# Altium PCB PROC106B_ASCII.PcbDoc (part 8 of 8)
Units mil, origin at the board's own origin, x right, y up, seen from the top; angles counter-clockwise.
Board outline 4498.18 x 1060.53 mil, 8 copper layers (Top Layer, GND1, Sig1, PWR1, PWR2, Sig2, GND2, Bottom Layer), stack 69.602 mil thick; 439 components, 327 nets, 1548 pads, 843 vias.
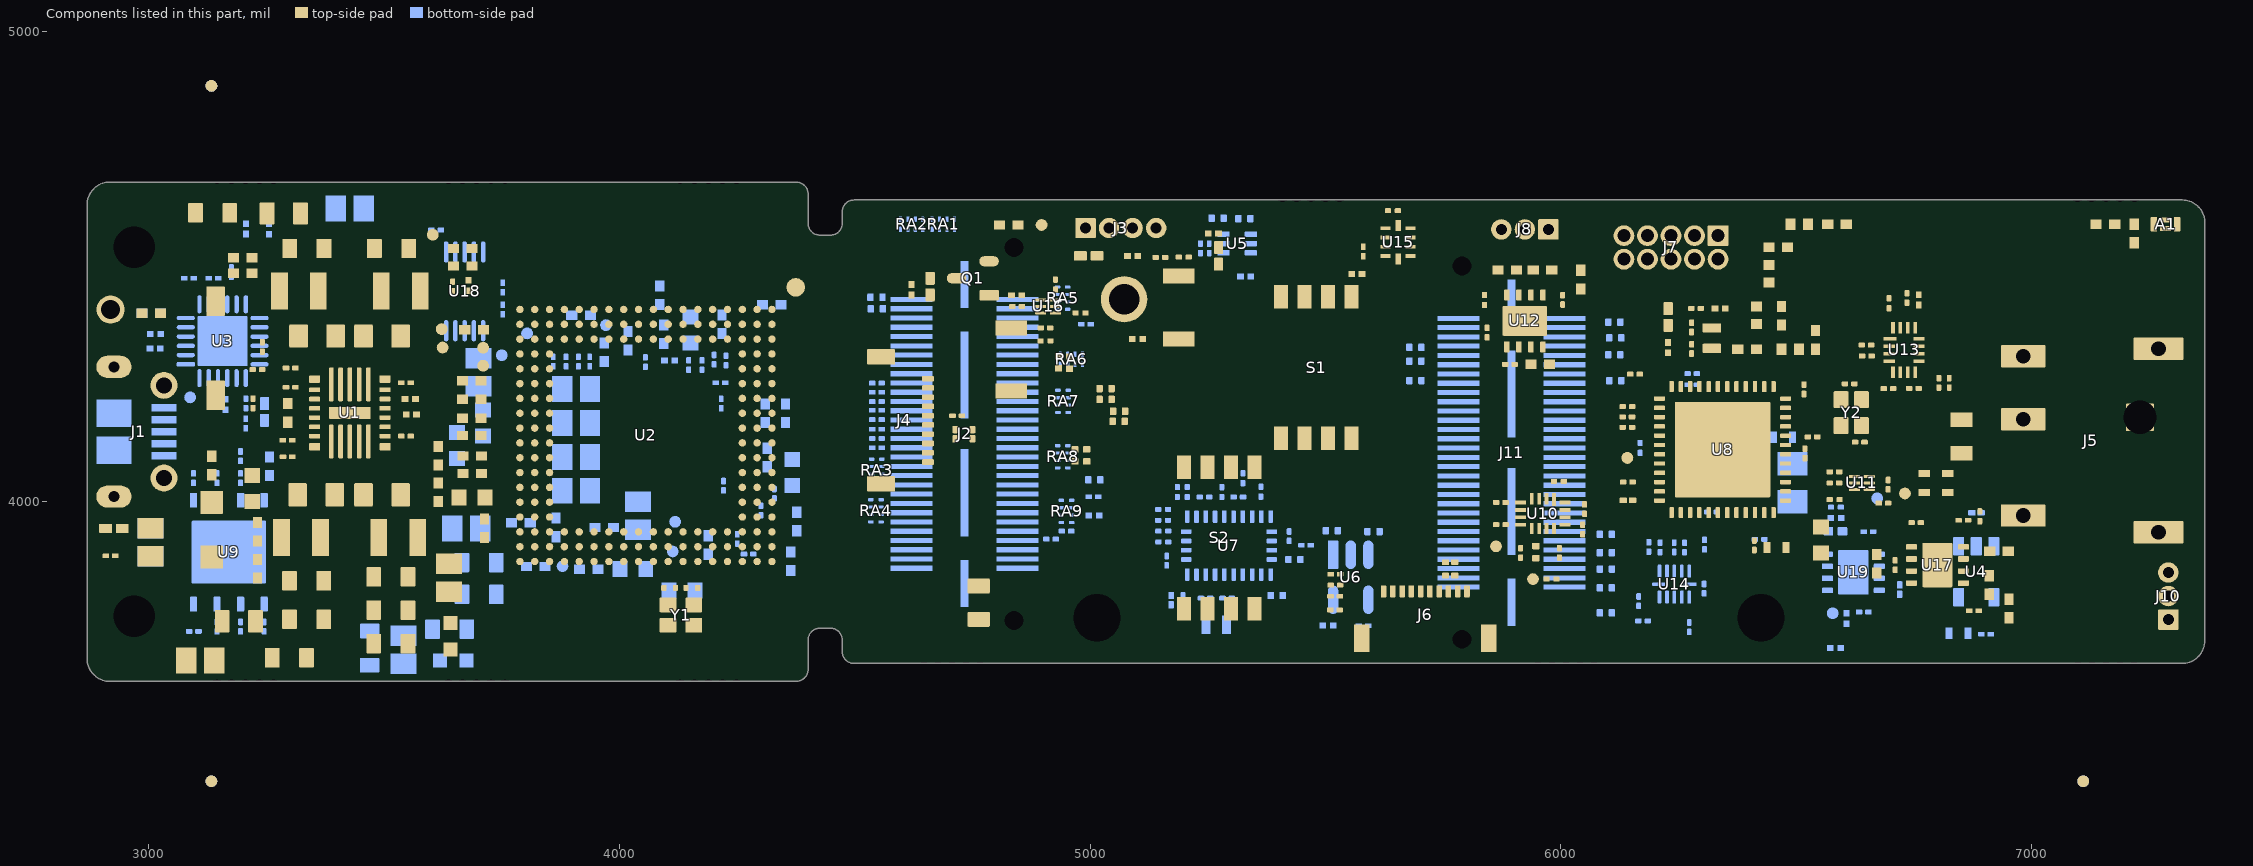
[diagram p14: the components of this part, seen from the top]

## Silkscreen, mask and mechanical layers (free items; w line width, h text height) (continued)
Mechanical 24:
  drawing of 10999 lines, arcs and shapes, not listed
  text "TP33" at 6097.58,6677.7 h30
  text "5V_LED" at 6651.08,6662.7 h30
  text "GND" at 6113.08,6617.7 h30
  text "32" at 8052.58,6517.7 h20
  text "17" at 8422.58,6517.7 h20
  text "U3" at 7956.58,6497.7 h30
  text "D1" at 6081.58,6467.7 h30
  text "33" at 7982.58,6452.7 h20
  text "16" at 8467.58,6452.7 h20
  text "SPARE" at 5513.58,6424.7 h30 r90
  text "DATA_TRAN_PRG" at 5228.58,6398.7 h30 r90
  text "SD_FULL" at 5443.58,6385.7 h30 r90
  text "HDR_ERR" at 5868.58,6380.7 h30 r90
  text "DDR_FULL" at 5588.58,6368.7 h30 r90
  text "LVDS_PATH_ERR" at 5798.58,6363.7 h30 r90
  text "FPGA_ERR" at 5658.58,6358.7 h30 r90
  text "D4" at 7528.58,6350.7 h30 r90
  text "D3" at 7023.58,6346.7 h30 r90
  text "EEPROM_RD_FAIL" at 5998.58,6341.7 h30 r90
  text "D2" at 6548.58,6341.7 h30 r90
  text "SD_DETECT" at 5368.58,6336.7 h30 r90
  text "SW1" at 5689.58,6332.7 h30
  text "6" at 5726.08,6292.7 h20
  text "12BIT_OFF" at 5764.08,6257.7 h30
  text "12BIT_ON" at 5209.58,6232.7 h30
  text "9" at 7141.08,6217.7 h20
  text "9" at 6171.08,6212.7 h20
  text "D6" at 6991.58,6212.7 h30
  text "D8" at 7491.58,6212.7 h30
  text "14BIT_OFF" at 5764.08,6207.7 h30
  text "D7" at 6516.58,6207.7 h30
  text "16" at 7372.58,6202.7 h20
  text "14BIT_ON" at 5209.58,6182.7 h30
  text "16" at 6372.58,6182.7 h20
  text "U1" at 6261.58,6162.7 h30
  text "U2" at 7231.58,6162.7 h30
  text "D5" at 6111.58,6147.7 h30
  text "16BIT_ON" at 5209.58,6132.7 h30
  text "48" at 7952.58,6117.7 h20
  text "3" at 5401.08,6097.7 h20
  text "16BIT_OFF" at 5717.58,6087.7 h30
  text "2" at 8776.08,6074.36 h25
  text "64" at 8412.58,6032.7 h20
  text "49" at 8027.58,6027.7 h20
  text "RADAR_FTDI" at 8900.08,6012.7 h30
  text "Y1" at 8771.58,6002.7 h30
  text "L1" at 5883.58,5997.7 h30
  text "L4" at 7673.58,5980.7 h30 r90
  text "L2" at 6693.58,5972.7 h30 r90
  text "L3" at 6888.58,5970.7 h30 r90
  text "8" at 8763.58,5905.2 h20 r90
  text "USER_SW3" at 5358.58,5867.2 h30 r90
  text "USER_SW2" at 5418.58,5867.2 h30 r90
  text "LVDS_CAPT" at 5743.58,5866.2 h30 r90
  text "USER_SW1" at 5473.58,5862.2 h30 r90
  text "HW_CONFIG" at 5520.25,5858.2 h30 r90
  text "RAW_MODE" at 5578.58,5857.2 h30 r90
  text "3" at 8856.08,5852.7 h20
  text "SD_STORE" at 5678.58,5852.2 h30 r90
  text "1243_MODE" at 5628.58,5843.2 h30 r90
  text "8" at 5296.08,5822.7 h20
  text "D9" at 8779.58,5802.7 h30
  text "LVDS_MODE_SEL" at 5238.58,5747.2 h30 r90
  text "4" at 8480.59,5723.37 h20
  text "5" at 8736.08,5697.7 h20
  text "Y2" at 8273.58,5675.7 h30 r90
  text "U4" at 8581.58,5652.7 h30
  text "2V5" at 7516.08,5622.2 h30 r90
  text "17" at 7892.58,5617.7 h20
  text "SW2" at 5828.58,5603.7 h30 r90
  text "32" at 7562.58,5587.7 h20
  text "U5" at 7176.58,5577.7 h30
  text "J1" at 9096.58,5577.7 h30
  text "5" at 7271.08,5552.7 h20
  text "8" at 7106.08,5547.7 h20
  text "33" at 7482.58,5522.7 h20
  text "16" at 7992.58,5507.7 h20
  text "1V35" at 6414.84,5503.2 h30 r90
  text "9" at 5311.08,5482.7 h20
  text "16" at 5752.58,5472.7 h20
  text "VCC_CORE" at 6179.84,5427.2 h30 r90
  text "U7" at 6421.58,5317.7 h30
  text "8" at 6541.08,5302.7 h20
  text "DATA_MODE" at 5673.58,5183.2 h30 r90
  text "SW_CONFIG" at 5618.58,5178.2 h30 r90
  text "48" at 7487.58,5157.7 h20
  text "ETH_STREAM" at 5773.58,5152.2 h30 r90
  text "AR1642_MODE" at 5723.58,5132.2 h30 r90
  text "DMM_PLAYBACK" at 5823.58,5111.2 h30 r90
  text "4" at 6291.08,5111.03 h20
  text "3" at 5316.08,5087.7 h20
  text "1V1" at 7156.08,5082.2 h30 r90
  text "5" at 6536.08,5072.7 h20
  text "49" at 7587.58,5062.68 h20
  text "64" at 7907.58,5062.68 h20
  text "U6" at 7736.58,5052.7 h30
  text "U8" at 6536.58,4977.7 h30
  text "3" at 6486.08,4937.7 h20
  text "6" at 6676.08,4837.7 h20
  text "4" at 6491.08,4827.7 h20
  text "RADAR_5V_IN" at 5223.58,4770.2 h30 r90
  text "DC_JACK_5V_IN" at 5868.58,4762.2 h30 r90
  text "SW3" at 5449.58,4742.7 h30
  text "U10" at 7609.58,4727.7 h30
  text "U11" at 8089.58,4727.7 h30
  text "FPGA_PROGRAMN_LED" at 5192.08,4652.7 h30
  text "6" at 6406.08,4582.7 h20
  text "J3" at 5826.58,4532.7 h30
  text "U9" at 6268.58,4480.7 h30 r90
  text "FPGA_INITN" at 5245.08,4442.7 h30
  text "3" at 6261.08,4442.7 h20
  text "4" at 6441.08,4427.7 h20
  text "FPGA_RST" at 5253.08,4392.7 h30
  text "2" at 5726.08,4382.7 h20
  text "U12" at 7268.58,4263.7 h30 r90
  text "Q1" at 8551.58,4257.7 h30
  text "FPGA_DONE_LED" at 8753.58,4237.2 h30 r90
  text "FPGA_JTAG" at 8919.08,4187.7 h30
  text "J4" at 9056.58,4122.7 h30
  text "SW4" at 5458.58,4113.7 h30 r90
  text "FPGA_PROGRAMN_SW" at 5218.58,3960.2 h30 r90
  text "5" at 8936.08,3947.7 h20
  text "D10" at 5503.58,3923.7 h30 r90
  text "60_PIN_RADAR_CONN" at 6188.58,3856.2 h30 r90
  text "U13" at 6674.58,3822.7 h30
  text "17" at 8122.58,3822.19 h20
  text "9" at 7507.34,3812.7 h20
  text "D11" at 8839.58,3812.7 h30
  text "3" at 6751.08,3792.7 h20
  text "4" at 6671.08,3787.7 h20
  text "16" at 7108.84,3787.7 h20
  text "59" at 6042.58,3777.7 h20
  text "32" at 7782.58,3777.7 h20
  text "60" at 5732.58,3767.7 h20
  text "U15" at 7699.58,3732.7 h30
  text "33" at 7687.58,3687.7 h20
  text "TP32" at 5527.58,3682.7 h30
  text "SW5" at 5424.58,3672.7 h30
  text "FPGA_CFG0" at 6318.58,3656.7 h30 r90
  text "FPGA_CFG1" at 6368.58,3656.7 h30 r90
  text "2" at 5416.08,3612.7 h20
  text "8" at 6151.08,3597.7 h20
  text "GND" at 5648.58,3577.2 h30 r90
  text "D12" at 5478.58,3568.7 h30 r90
  text "CAPTURE_START" at 5238.58,3562.2 h30 r90
  text "U14" at 7108.58,3555.38 h30 r90
  text "FPGA_CFG2" at 6493.58,3466.7 h30 r90
  text "S1" at 6116.58,3437.7 h30
  text "2" at 5453.08,3422.7 h20
  text "FPGA_RST_SW" at 5696.08,3417.7 h30
  text "D13" at 5569.58,3412.7 h30
  text "D14" at 6034.58,3397.7 h30
  text "48" at 7687.58,3382.7 h20
  text "2" at 5986.08,3377.7 h20
  text "2" at 8556.08,3360.2 h25
  text "8" at 7542.34,3347.7 h20
  text "49" at 7782.58,3307.7 h20
  text "64" at 8157.58,3302.7 h20
  text "Y3" at 8541.58,3302.7 h30
  text "4" at 6441.08,3287.7 h20
  text "3" at 5981.08,3222.7 h20
  text "SPARE_GPIO" at 5228.58,3219.2 h30 r90
  text "SW6" at 5341.58,3212.7 h30
  text "SW7" at 5819.58,3202.7 h30

## Text inside footprints (layer, text, board x,y; h text height)
S1: Top Overlay "1" at 5340.27,4151.63 h25; M5 Assembly Top "1" at 5403,4184 h15
S2: Top Overlay "1" at 5149.19,3765.77 h25; M5 Assembly Top "1" at 5198,3824 h15
ZZ1: M5 Assembly Top "Install label in silkscreened box after final wash.  Text shall be 8 pt font.  Text shall be per the Label Table in the PDF schematic." at 2394.62,2794.36 h40